# Altium PCB NGUON_A313.PcbDoc
Units mm, origin at the board's own origin, x right, y up, seen from the top; angles counter-clockwise.
Board outline 153 x 94 mm, 2 copper layers (Top Layer, Bottom Layer); 50 components, 28 nets, 281 pads, 12 vias.
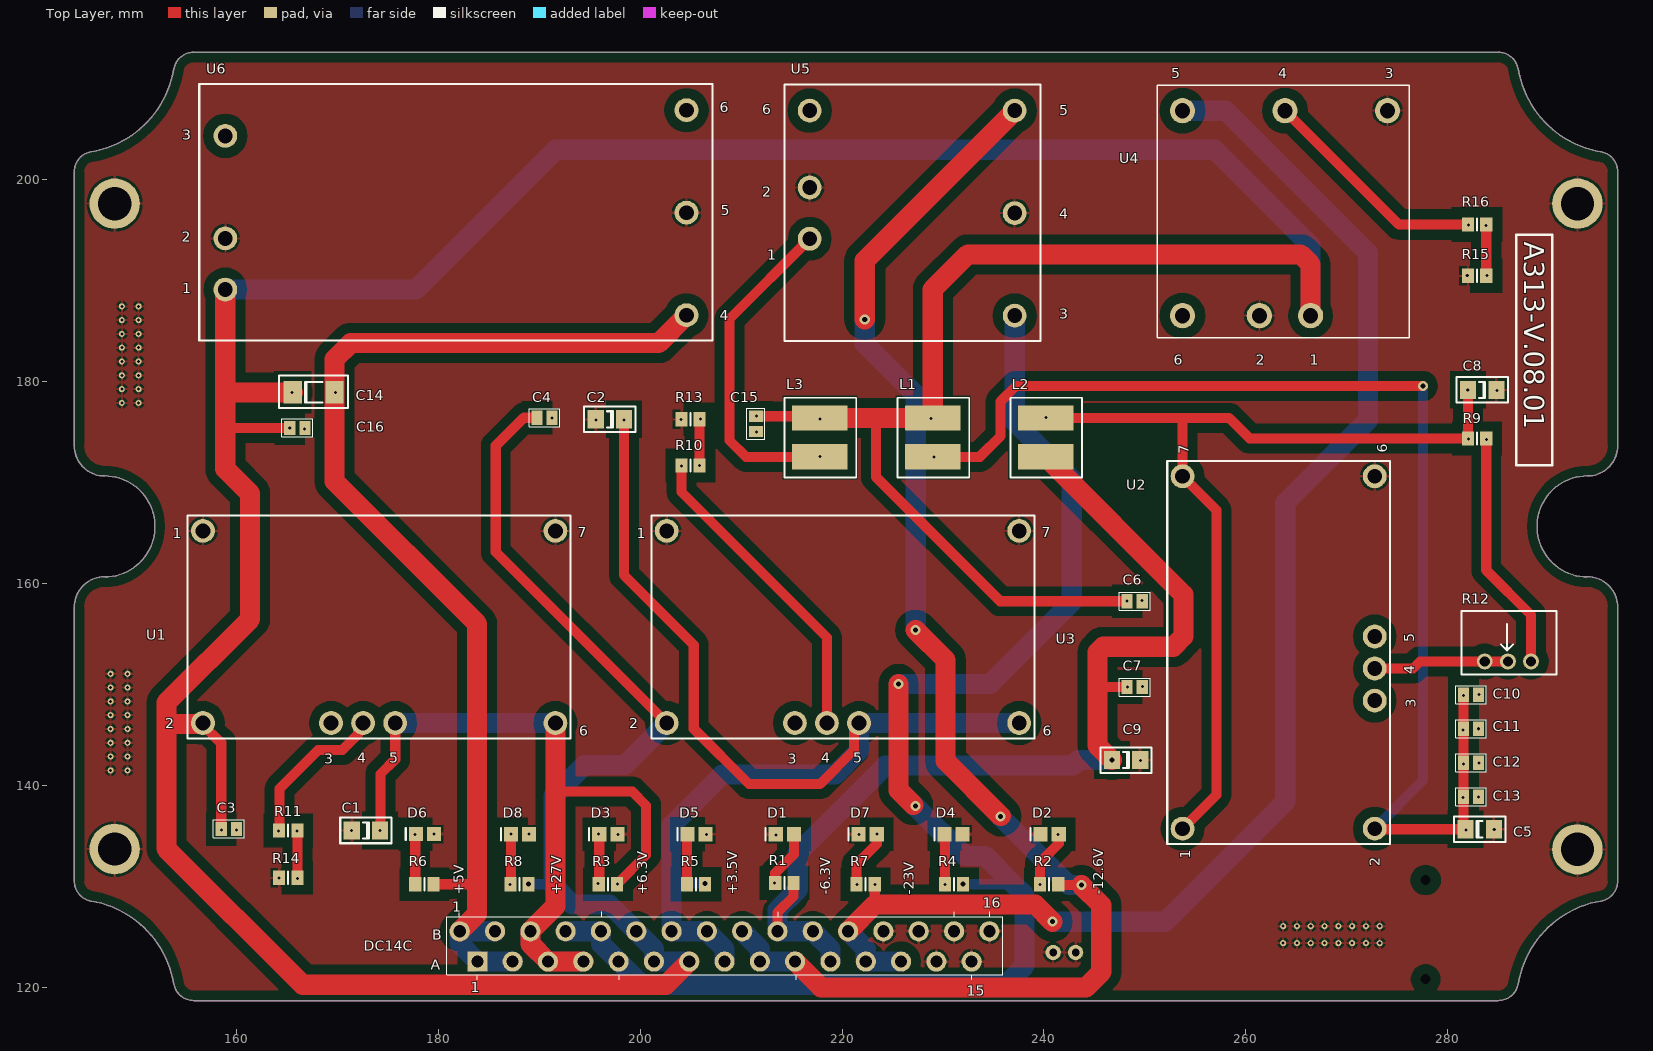
[diagram p0: Top Layer view]
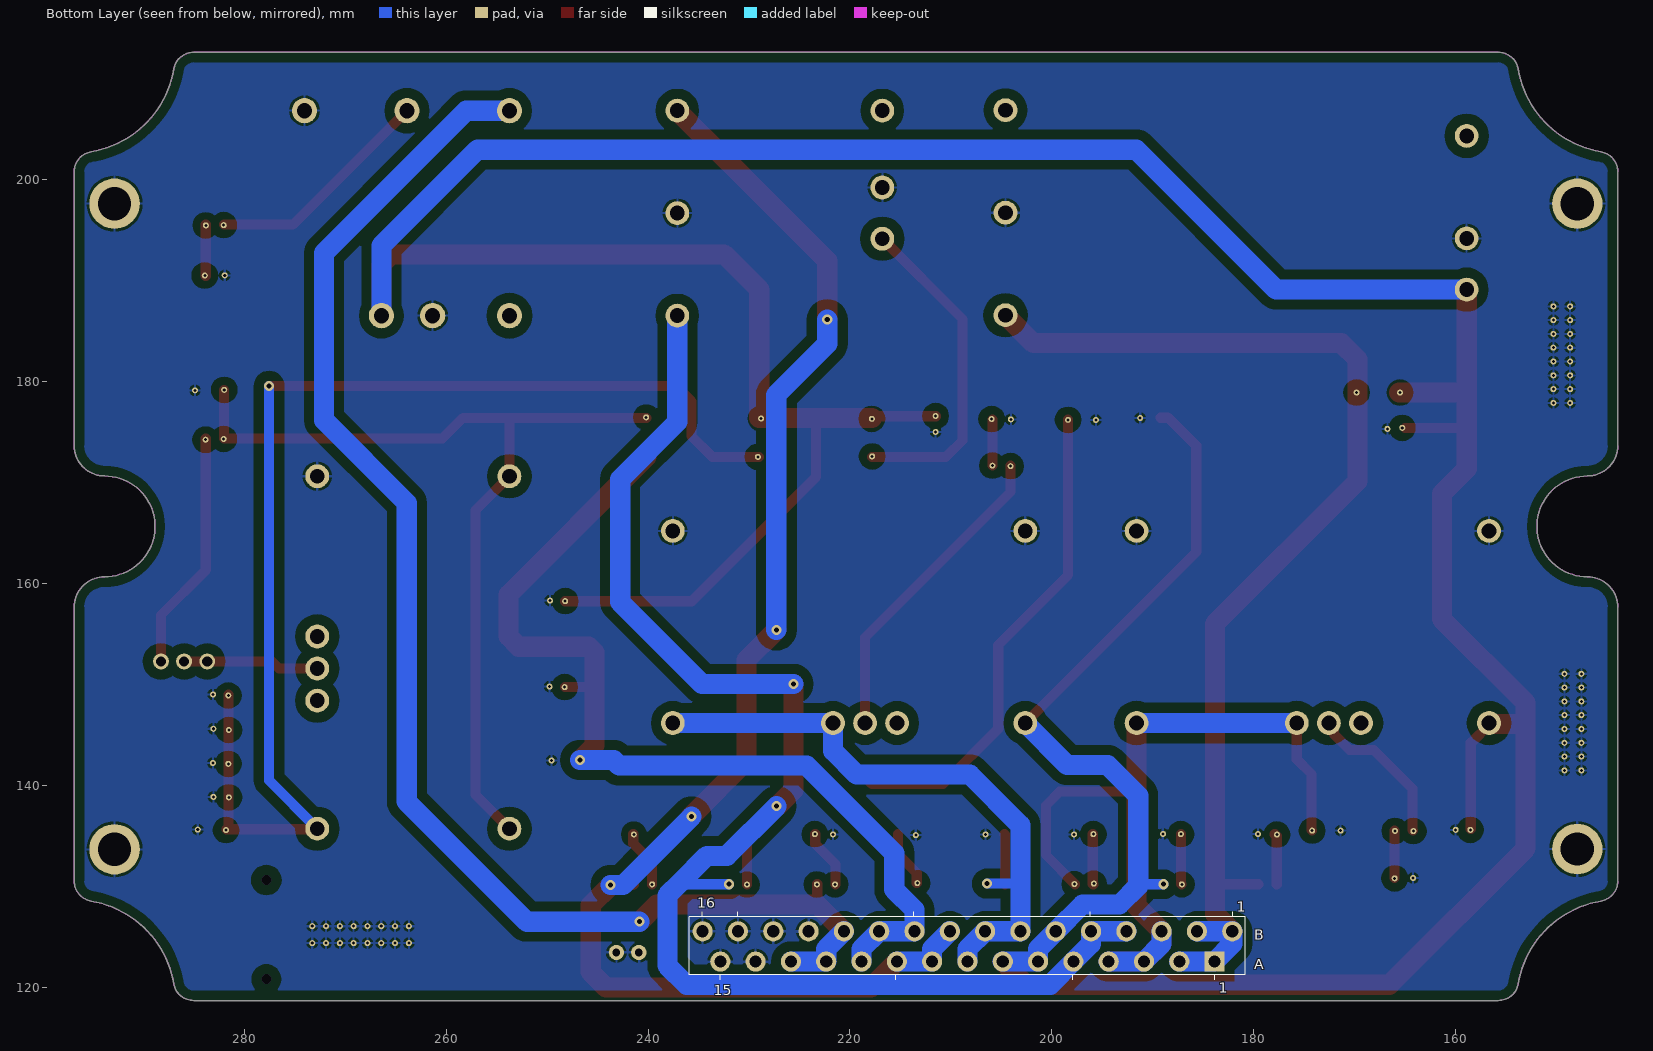
[diagram p1: Bottom Layer view, seen from below]

## Layer stack, top to bottom
Top Solder: solder mask 0.0102, Solder Resist, Dk 3.5
Top Layer: signal copper 0.0356
Dielectric 1: dielectric 0.32, FR-4, Dk 4.8
Bottom Layer: signal copper 0.0356
Bottom Solder: solder mask 0.0102, Solder Resist, Dk 3.5

## Board outline
145.557,128.518 cw(c145.891,130.49) 143.891,130.49 143.891,157.658 cw(c146.891,157.658) 146.891,160.658 ccw(c146.891,165.658) 146.891,170.658 cw(c146.891,173.658) 143.891,173.658 143.891,200.826 cw(c145.891,200.826) 145.557,202.798 ccw(c143.891,212.658) 153.751,210.992 cw(c155.723,210.658) 155.723,212.658 285.059,212.658 cw(c285.059,210.658) 287.031,210.992 ccw(c296.891,212.658) 295.224,202.798 cw(c294.891,200.826) 296.891,200.826 296.891,173.658 cw(c293.891,173.658) 293.891,170.658 ccw(c293.891,165.658) 293.891,160.658 cw(c293.891,157.658) 296.891,157.658 296.891,130.49 cw(c294.891,130.49) 295.224,128.518 ccw(c296.891,118.658) 287.031,120.325 cw(c285.059,120.658) 285.059,118.658 155.723,118.658 cw(c155.723,120.658) 153.751,120.325 ccw(c143.891,118.658)

## Design rules (kind name [scope] priority, off if disabled: settings)
Clearance [All] p1: gap=0.3 ignorepadtopadclearanceinfootprint=FALSE except(0.1: SMDPad-SMDPad; 1: Arc-Fill Arc-Poly Arc-Region Track-Fill Track-Poly Track-Region SMDPad-Fill SMDPad-Poly SMDPad-Region THPad-Fill THPad-Poly THPad-Region Via-Fill Via-Poly Via-Region Fill-Fill Fill-Poly Fill-Region Poly-Poly Poly-Region Region-Region)
HoleSize [All] p1: absolutevalues=TRUE maxlimit=4 minlimit=0.025 maxpercent=80.000 minpercent=20.000
MinimumSolderMaskSliver [All] p1: minsoldermaskwidth=0.05
PolygonConnect [All] p1: connectstyle=Relief reliefconductorwidth=0.254 reliefentries=4 polygonreliefangle="90 Angle" airgapwidth=0.254
RoutingVias [All] p1: holewidth=0.5 width=1 viastyle="Through Hole" minholewidth=0.5 minwidth=1 maxholewidth=0.5 maxwidth=1
SilkToSilkClearance [All] p1: silktosilkclearance=0.1
SilkToSolderMaskClearance [IsPad] p1: minsilkscreentomaskgap=0 clearancetoexposedcopper=TRUE
SolderMaskExpansion [All] p1: expansion=0.102
Width [All] p1: maxlimit=2 minlimit=1 preferedwidth=1
26 further rules are at their usual default settings.

## Components (designator, comment, footprint, x,y, rotation, side; value= is the part's Value field where it differs from the comment)
C1 "330U" 1206 172.797,135.52 r180 top
C2 "330U" 1206 196.977,176.274 r180 top
C3 "2.2U" C0805 159.208,135.672 r0 top
C4 "2.2U" C0805 190.5,176.426 r0 top
C5 "100u/50v" 1206 283.21,135.636 r0 top
C6 "1u/50v" C0805 249.01,158.242 r0 top
C7 "1u/50v" C0805 249.01,149.733 r0 top
C8 "100u/25v" 1206 283.458,179.197 r180 top
C9 "1000u/16v" 1206 248.158,142.494 r180 top
C10 "4.7u/50V" C0805 282.358,148.971 r0 top
C11 "4.7u/50V" C0805 282.358,145.599 r0 top
C12 "4.7u/50V" C0805 282.358,142.228 r0 top
C13 "4.7u/50V" C0805 282.358,138.856 r0 top
C14 "1000p/2KV" C1808 167.616,178.943 r0 top
C15 "4.7u" C0805 211.455,175.826 r270 top
C16 "4.7u" C0805 166,175.425 r0 top
D1 "LED3" CAPC2512L 214.33,135.141 r0 top
D2 "LED3" CAPC2512L 240.579,135.141 r0 top
D3 "LED3" CAPC2512L 196.831,135.141 r0 top
D4 "LED3" CAPC2512L 231.05,135.141 r0 top
D5 "LED3" CAPC2512L 205.581,135.141 r0 top
D6 "LED3" CAPC2512L 178.65,135.15 r0 top
D7 "LED3" CAPC2512L 222.54,135.141 r0 top
D8 "LED3" CAPC2512L 188.082,135.141 r0 top
DC14A "CON31" DC31C 199.587,130.629 r90 top
L1 "1-5uH" L_cuoncam 229.599,174.797 r0 top
L2 "1-5uH" L_cuoncam 240.792,174.797 r0 top
L3 "2.2uH" L_cuoncam 218.406,174.797 r0 top
R1 "Res3" 6-0805_N 214.28,130.315 r0 top value=680R
R2 "Res3" 6-0805_N 240.529,130.188 r0 top value=1.5K
R3 "Res3" 6-0805_N 196.781,130.188 r0 top value=680R
R4 "Res3" 6-0805_N 231.09,130.188 r0 top value=1.5K
R5 "Res3" 6-0805_N 205.531,130.188 r0 top value=330R
R6 "Res3" 6-0805_N 178.593,130.188 r0 top value=470R
R7 "Res3" 6-0805_N 222.34,130.188 r0 top value=3.3K
R8 "Res3" 6-0805_N 188.032,130.188 r0 top value=3.9K
R9 "4.18k" 6-0805_N 282.956,174.371 r0 top
R10 "62K" 6-0805_N 204.978,171.704 r0 top
R11 "1.6K" 6-0805_N 165.1,135.522 r0 top
R12 "POT" R_bientro 285.887,147.41 r270 top
R13 "100R" 6-0805_N 204.978,176.276 r0 top
R14 "10K" 6-0805_N 165.1,130.825 r0 top
R15 "47K" 6-0805_N 282.956,190.5 r180 top
R16 "910K" 6-0805_N 282.956,195.58 r0 top
U1 "PTN78020W" PTN78020W 173.863,154.051 r0 top
U2 "ptn78020a" PTN78020W 264.922,152.908 r90 top
U3 "PTN78020W" PTN78020W 219.837,154.051 r0 top
U4 "THN30-2415" THN30-2415 263.202,193.101 r0 top
U5 "thn30-2422" Thn30-2422-12V 226.314,195.373 r0 top
U6 "TEN40-2411N" TEN40 177.8,195.961 r0 top

## Footprints (in the part's own frame and the unit in brackets; to place one, negate y for a bottom-side part, rotate by r counter-clockwise, add the part's x,y. Pads: shape width x height; smd on the part's side, far side on the other; paste and mask are expansions set on the pad)
6-0805_N [mm] "Chip Resistor, Body 2.0x1.2mm, IPC Medium Density"
  rect 1.2x1.4 smd: 1(-0.9,0) 2(0.9,0)
  silkscreen extent 0,-0.6 0,0.6, body extent -1.07,-0.7 1.07,0.7, height 0.7
1206 [mm] "Chip Capacitor; Body 3.2 x 1.6 mm (LxW typ)"
  rect 1.6x1.8 smd: 1(-1.4,0) 2(1.4,0)
  silkscreen extent -2.54,-1.27 2.54,1.27
C0805 [mm] "Chip Capacitor, Body 2.0x1.3mm, IPC High Density"
  rect 1.1x1.4 smd: 1(-0.75,0) 2(0.75,0)
  silkscreen extent -1.52,-0.89 1.52,0.89, body extent -1.1,-0.72 1.1,0.72, height 1.4
C1808 [mm] "Chip Capacitor; Body 4.5 x 2.0 mm (LxW typ)"
  rect 1.8x2.25 smd: 1(-2.075,0) 2(2.075,0)
  silkscreen extent -3.43,-1.52 3.43,1.65
CAPC2512L [mm] "Chip Capacitor, Body 2.54x1.27mm, IPC High Density"
  rect 1.4x1.4 smd: 1(-0.9,0) 2(0.9,0)
  silkscreen extent -1.9,-0.6 -1.9,0.6, body extent -1.45,-0.82 1.45,0.82, height 1.3
DC31C [mm]
  rect 2x2 hole 1.2: 1(-8.104,15.737)
  round 2 hole 1.2: 2(-5.104,17.487) 3(-8.104,12.237) 4(-5.104,13.987) 5(-8.104,8.737) 6(-5.104,10.487) 7(-8.104,5.237) 8(-5.104,6.987) 9(-8.104,1.737) 10(-5.104,3.487) 11(-8.104,-1.763) 12(-5.104,-0.013) 13(-8.104,-5.263) 14(-5.104,-3.513) 15(-8.104,-8.763) 16(-5.104,-7.013) 17(-8.104,-12.263) 18(-5.104,-10.513) 19(-8.104,-15.763) 20(-5.104,-14.013) 21(-8.104,-19.263) 22(-5.104,-17.513) 23(-8.104,-22.763) 24(-5.104,-21.013) 25(-8.104,-26.263) 26(-5.104,-24.513) 27(-8.104,-29.763) 28(-5.104,-28.013) 29(-8.104,-33.263) 30(-5.104,-31.513) 31(-5.104,-35.013)
  silkscreen extent -9.91,-36.32 -3.18,18.79
L_cuoncam [mm]
  rect 5.5x2.5 smd: 1(-0.601,1.606) 2(-0.601,-2.244)
  silkscreen extent -4.1,-4.29 3,3.61, body extent -4.2,-4.39 3.1,3.71, height 3.81
PTN78020W [mil]
  round 93 / inner round 60 / far side round 93 hole 58: 1(-677.87,439.65) 2(-677.87,-310.35) 3(-177.87,-310.35) 4(-52.67,-310.35) 5(72.53,-310.35) 6(697.72,-310.35) 7(697.72,439.65)
  silkscreen extent -738,-370 757,499, body extent -698,-558 806,320, height 150
R_bientro [mil]
  round 62 / inner round 60 / far side round 62 hole 40: 1(-191.46,94.76) 2(-191.46,4.61) 3(-191.46,-85.55)
  silkscreen extent -388,-176 -140,194, body extent -392,-180 -136,198, height 150
TEN40 [mil]
  round 93 / inner round 60 / far side round 93 hole 58: 1(-745.67,-268.81) 2(-745.67,-68.81) 3(-745.67,331.19) 4(1054.33,-368.81) 5(1054.33,31.19) 6(1054.33,431.19)
  silkscreen extent -847,-467 1157,533
THN30-2415 [mm]
  round 2.5 / inner round 1.524 / far side round 2.5 hole 1.5: 1(3.244,-6.555) 2(-1.836,-6.555) 3(10.864,13.765) 4(0.704,13.765) 5(-9.456,13.765) 6(-9.456,-6.555)
  silkscreen extent -11.96,-8.74 13.05,16.27
Thn30-2422-12V [mil]
  round 93 / inner round 60 / far side round 93 hole 58: 1(-374.8,-47.24) 2(-374.8,152.76) 3(425.2,-347.24) 4(425.2,52.76) 5(425.2,452.76) 6(-374.8,452.76)
  silkscreen extent -473,-446 527,554, body extent -477,-450 531,558, height 150

## Part data
C1 C2 C5 C8 C9: library part CAPACITOR
C3 C4 C6 C7 C10 C11 C12 C13: library part "CAP NP"
C14 C15 C16: library part "CAPACITOR NON-POL"
D1 D2 D3 D4 D5 D6 D7 D8: "Typical BLUE SiC LED", DatasheetVersion=16-Apr-2002, LatestRevisionDate=17-Dec-2003, LatestRevisionNote="PCB Footprint replaced.", PackageReference=3.5X2.8X1.9, PackageVersion=16-Apr-2002, Published=8-Jun-2000, Publisher="Altium Limited"
L1 L2: library part INDUCTOR
L3: library part INDUCTOR_Dup1
R1 R2 R3 R4 R5 R6 R7 R8: "Resistor", LatestRevisionDate=29-May-2009, LatestRevisionNote="IPC-7351 Footprint Added.", PackageDescription="Chip Resistor", PackageReference=J1-0603, Published=8-Jun-2000, Publisher="Altium Limited"
R9 R10 R11 R13 R14 R15 R16: library part RESISTOR
R12: library part POT_Dup1
U1 U3: library part ptn78020w_8
U2: library part PTN78020A_0
U4: library part thn30-2415_1
U6: library part thn30-2422_0

## Free pads (board coordinates)
  round 0.6 hole 0.3: 1(147.5,141.475) 1(147.5,142.843) 1(147.5,144.211) 1(147.5,145.579) 1(147.5,146.946) 1(147.5,148.314) 1(147.5,149.682) 1(147.5,151.05) 1(148.6,177.9) 1(148.6,179.268) 1(148.6,180.636) 1(148.6,182.004) 1(148.6,183.371) 1(148.6,184.739) 1(148.6,186.107) 1(148.6,187.475) 1(149.175,141.475) 1(149.175,142.843) 1(149.175,144.211) 1(149.175,145.579) 1(149.175,146.946) 1(149.175,148.314) 1(149.175,149.682) 1(149.175,151.05) 1(150.275,177.9) 1(150.275,179.268) 1(150.275,180.636) 1(150.275,182.004) 1(150.275,183.371) 1(150.275,184.739) 1(150.275,186.107) 1(150.275,187.475) 1(263.725,124.349) 1(263.725,126.024) 1(265.093,126.024) 1(265.093,124.349) 1(266.461,126.024) 1(266.461,124.349) 1(267.829,126.024) 1(267.829,124.349) 1(269.196,126.024) 1(269.196,124.349) 1(270.564,126.024) 1(270.564,124.349) 1(271.932,126.024) 1(271.932,124.349) 1(273.3,126.024) 1(273.3,124.349) 5(158.5,135.575) 5(159.95,135.575) 5(164.15,135.45) 5(164.175,130.8) 5(165.25,175.425) 5(165.475,178.925) 5(165.975,135.475) 5(166,130.775) 5(166.725,175.325) 5(169.775,178.925) 5(171.35,135.5) 5(174.175,135.5) 5(177.675,135.1) 5(179.55,135.15) 5(187.1,130.175) 5(187.2,135.15) 5(188.95,135.175) 5(191.225,176.4) 5(195.625,176.2) 5(195.825,130.25) 5(195.875,135.15) 5(197.75,130.2) 5(197.775,135.125) 5(198.375,176.225) 5(204.05,176.275) 5(204.075,171.625) 5(205.875,171.675) 5(205.95,176.3) 5(206.55,135.125) 5(211.5,175.025) 5(211.5,176.6) 5(213.325,130.3) 5(213.475,135.05) 5(217.8,172.6) 5(217.825,176.325) 5(221.475,130.175) 5(221.675,135.125) 5(223.275,130.175) 5(223.475,135.15) 5(228.8,176.35) 5(229.125,172.55) 5(230.2,130.15) 5(239.6,130.175) 5(240.2,176.475) 5(241.425,135.125) 5(248.225,158.25) 5(248.275,149.725) 5(249.575,142.45) 5(249.725,158.3) 5(249.775,149.775) 5(281.575,138.8) 5(281.575,145.475) 5(281.625,142.125) 5(281.625,148.9) 5(281.85,135.55) 5(281.975,190.55) 5(282.025,179.2) 5(282.075,174.325) 5(282.075,195.525) 5(283.1,138.85) 5(283.1,145.6) 5(283.125,149) 5(283.15,142.2) 5(283.85,195.5) 5(283.875,174.25) 5(283.956,190.525) 5(284.65,135.6) 5(284.925,179.15)
  round 1.524 hole 0.762: 1(240.925,123.425) 1(243.15,123.425)
  round 0 hole 1: 6(277.85,130.6) 7(277.85,120.775)
  round 5 hole 3.3: CK(147.9,133.675) CK(147.9,197.65) CK(292.9,133.65) CK(292.9,197.65)

## Via types
v1: diameter 1, hole 0.5, Top Layer to Bottom Layer, 12 vias

## Nets (pads, with @x,y where several pads share a name; then routed paths per layer and width w, separated by ;. In a path a pad name is that pad's centre, name@x,y a point inside that pad or via, vN(x,y) a via of type N, cw(c..) or ccw(c..) an arc to the next point about the centre after c; other vN are vias at no path point)
27V: C3.1 C4.1 C6.1 C14.1 C15.1 C16.1 DC14A.11 DC14A.12 DC14A.13 L1.1 L3.1 pad.5@158.5,135.575 pad.5@165.25,175.425 pad.5@165.475,178.925 pad.5@211.5,176.6 pad.5@217.825,176.325 pad.5@228.8,176.35 pad.5@248.225,158.25 R8.2 U1.2 U3.2 U4.1 U6.1 | length 462.8
  Top Layer w1: U1.2@156.552,146.075 158.458,144.169 ; C3.1 158.458,144.169 ; 158.458,144.255 158.458,144.169 ; 158.86,175.4 158.885,175.425 C16.1@164.975,175.425 ; C4.1@189.2,176.426 188.451,176.426 185.675,173.65 185.675,163.112 U3.2 ; C15.1 217.632,176.576 L3.1 ; 223.35,176.403 223.35,170.575 235.683,158.242 C6.1
  Top Layer w2: U1.2@156.552,146.075 153.025,146.075 ; U6.1 158.86,178.85 ; C14.1 158.953,178.943 158.86,178.85 ; DC14A.13 202.55,120.225 166.525,120.225 153.025,133.725 153.025,146.075 ; L3.1 223.35,176.403 L1.1 228.998,189.148 232.475,192.625 265.45,192.625 266.446,191.629 U4.1 ; 153.025,146.075 153.025,148.175 161.325,156.475 161.325,168.9 158.86,171.365 158.86,175.4 158.86,178.85
  Bottom Layer w1: v1(188.932,130.188) 191.262,130.188 191.425,130.025
  Bottom Layer w2: U6.1 177.733,189.133 191.6,203 256.925,203 266.446,193.479 U4.1 ; U3.2 198.451,142 194.45,142 191.425,138.975 191.425,130.025 193.275,128.175 196.95,128.175 DC14A.12 201.35,123.775 DC14A.11 DC14A.13
+3.5V: C2.1 DC14A.14 DC14A.15 DC14A.16 pad.5@198.375,176.225 R5.2 U3.5 U3.6 | length 117.4
  Top Layer w1: C2.1 198.377,160.826 205.3,153.903 205.3,145.6 210.768,140.132 217.825,140.132 221.18,143.487 221.18,145.669 U3.5
  Bottom Layer w1: 203.1,130.125 203.219,130.244 v1(206.431,130.244)
  Bottom Layer w2: DC14A.15 208.35,123.775 DC14A.16 DC14A.14 203.1,130.125 203.1,136.05 208.1,141.05 219.325,141.05 221.679,143.404 U3.5 U3.6
+5V: C14.2 DC14A.1 DC14A.2 DC14A.3 DC14A.4 pad.5@169.775,178.925 R6.2 U6.4 | length 115
  Top Layer w1: R6.2 183.812,130.188 183.825,130.175
  Top Layer w2: DC14A.2 183.825,127.25 183.825,130.175 183.825,156 169.691,170.134 C14.2 169.691,182.227 171.289,183.825 201.812,183.825 U6.4
  Bottom Layer w2: DC14A.4 DC14A.2 182.1,124.275 DC14A.1 DC14A.3
+6.3V: C1.1 DC14A.5 DC14A.6 DC14A.7 pad.5@174.175,135.5 pad.5@197.75,130.2 R3.2 U1.5 U1.6 | length 81.8
  Top Layer w1: C1.1 174.247,135.57 174.247,141.122 175.705,142.58 U1.5 ; 191.585,139.375 199.2,139.375 200.575,138 200.575,133.082 R3.2
  Top Layer w2: U1.6 191.585,139.375 191.585,128.01 DC14A.6 189.1,124.275 DC14A.5 DC14A.7
  Bottom Layer w2: U1.5@175.706,146.168 U1.6 ; DC14A.6 189.1,124.275 DC14A.5 DC14A.7
+12.6V: DC14A.8 DC14A.9 DC14A.10 R4.2 U5.3 | length 139.4
  Top Layer w2: v1(225.6,150.05) 225.6,139.5 v1@227.05,138.05
  Bottom Layer w1: v1(231.99,130.19) 236.615,130.19 236.8,130.375
  Bottom Layer w2: DC14A.8 DC14A.10 196.1,124.275 DC14A.9 200.15,120.225 205.803,120.225 207.397,120.225 209.303,120.225 210.897,120.225 216.303,120.225 217.897,120.225 219.803,120.225 221.397,120.225 226.803,120.225 228.397,120.225 230.303,120.225 231.897,120.225 236.2,120.225 238.1,122.125 238.1,129.075 236.8,130.375 234.175,133 232.2,133 v1(227.275,137.925) ; v1(225.6,150.05) 234.675,150.05 242.775,158.15 242.775,170.35 237.114,176.011 U5.3
-6.3V: C7.1 C9.2 DC14A.20 DC14A.21 DC14A.22 L2.2 pad.5@248.275,149.725 R1.2 | length 103.2
  Top Layer w1: DC14A.20 213.6,127.4 215.18,128.98 R1.2 ; 245.325,149.475 245.583,149.733 C7.1
  Top Layer w2: L2.2 253.85,158.894 253.85,154.75 252.825,153.725 245.875,153.725 245.325,153.175 245.325,149.475 245.325,143.927 v1(246.758,142.494)
  Bottom Layer w2: DC14A.21 218.85,123.775 DC14A.22 DC14A.20 213.6,127.65 215.6,129.65 215.6,133.275 224.275,141.95 242.875,141.95 243.419,142.494 v1(246.758,142.494)
-12.6V: DC14A.17 DC14A.18 DC14A.19 R2.2 U5.5 | length 143.6
  Top Layer w1: R2.2 241.517,130.1 v1(243.725,130.1)
  Top Layer w2: DC14A.19 217.909,119.966 244.191,119.966 245.7,121.475 245.7,128.125 v1(243.725,130.1) ; v1(222.25,186.175) 222.25,192.009 U5.5 ; v1(227.3,155.375) 230.25,152.425 230.25,142.425 v1@235.737,136.938
  Bottom Layer w2: DC14A.18 211.85,123.775 DC14A.17 DC14A.19 ; v1(222.25,186.175) 222.25,183.75 227.3,178.7 v1(227.3,155.375) ; v1(235.7,136.9) 242.5,130.1 v1(243.725,130.1)
-23V: DC14A.23 DC14A.24 DC14A.25 pad.5@223.275,130.175 R7.2 U4.5 | length 141.3
  Top Layer w1: R7.2 223.24,128.185 223.25,128.175
  Top Layer w2: DC14A.24 223.25,128.175 239.15,128.175 v1(240.85,126.475)
  Bottom Layer w2: DC14A.24 222.35,123.775 DC14A.23 DC14A.25 ; v1(240.85,126.475) 252.025,126.475 263.925,138.375 263.925,167.975 272.125,176.175 272.125,192.775 258.034,206.866 U4.5
GND: C1.2 C2.2 C3.2 C4.2 C5.2 C6.2 C7.2 C8.1 C9.1 C10.2 C11.2 C12.2 C13.2 C15.2 C16.2 D1.1 D2.1 D3.2 D4.2 D5.2 D6.2 D7.1 D8.2 DC14A.26 DC14A.27 DC14A.28 DC14A.29 DC14A.30 DC14A.31 pad.1 pad.5@159.95,135.575 pad.5@164.175,130.8 pad.5@166.725,175.325 pad.5@171.35,135.5 pad.5@179.55,135.15 pad.5@188.95,135.175 pad.5@191.225,176.4 pad.5@195.625,176.2 pad.5@197.775,135.125 pad.5@204.05,176.275 pad.5@206.55,135.125 pad.5@211.5,175.025 pad.5@213.475,135.05 pad.5@221.675,135.125 pad.5@249.575,142.45 pad.5@249.725,158.3 pad.5@249.775,149.775 pad.5@281.975,190.55 pad.5@283.1,138.85 pad.5@283.1,145.6 pad.5@283.15,142.2 pad.5@283.125,149 pad.5@284.65,135.6 pad.5@284.925,179.15 pad.CK R13.1 R14.1 R15.2 U1.1 U1.7 U2.6 U3.1 U3.7 U4.2 U4.3 U5.2 U5.4 U6.2 U6.5
NetC5_1: C5.1 C10.1 C11.1 C12.1 C13.1 L1.2 pad.5@229.125,172.55 pad.5@281.85,135.55 pad.5@281.575,138.8 pad.5@281.575,145.475 pad.5@281.625,142.125 pad.5@281.625,148.9 U2.2 | length 121.8
  Top Layer w1: L1.2 233.653,172.553 235.725,174.625 235.725,178.058 237.242,179.575 v1(277.575,179.575) ; U2.2 272.859,135.636 C5.1 281.608,135.838 C10.1
  Bottom Layer w1: U2.2 277.575,140.46 v1(277.575,179.575)
NetC8_2: C8.2 L2.1 pad.5@240.2,176.475 pad.5@282.025,179.2 pad.5@282.075,174.325 R9.1 U2.1 U2.7 | length 91.1
  Top Layer w1: L2.1 253.65,176.403 ; U2.1 257.1,139.035 257.1,167.285 U2.7 253.755,176.298 253.65,176.403 ; C8.2 282.056,179.195 R9.1 260.404,174.371 258.372,176.403 253.65,176.403
NetD1_2: D1.2 pad.5@213.325,130.3 R1.1 | length 5.6
  Top Layer w1: R1.1 213.38,131.305 215.23,133.155 D1.2
NetD2_2: D2.2 pad.5@239.6,130.175 pad.5@241.425,135.125 R2.1 | length 5.7
  Top Layer w1: R2.1 239.629,132.379 241.479,134.229 D2.2
NetD3_1: D3.1 pad.5@195.825,130.25 pad.5@195.875,135.15 R3.1 | length 5
  Top Layer w1: R3.1 195.931,130.238 D3.1
NetD4_1: D4.1 pad.5@230.2,130.15 R4.1 | length 4.8
  Top Layer w1: R4.1 D4.1@230.19,134.941
NetD5_1: D5.1 R5.1 | length 5
  Top Layer w1: R5.1 204.631,135.091 D5.1
NetD6_1: D6.1 pad.5@177.675,135.1 R6.1 | length 5
  Top Layer w1: R6.1 177.693,134.941 D6.1@177.893,135.141
NetD7_2: D7.2 pad.5@221.475,130.175 pad.5@223.475,135.15 R7.1 | length 5.8
  Top Layer w1: R7.1 221.44,132.165 223.44,134.165 D7.2
NetD8_1: D8.1 pad.5@187.1,130.175 pad.5@187.2,135.15 R8.1 | length 5
  Top Layer w1: R8.1 187.182,130.238 D8.1
NetL3_2: L3.2 pad.5@217.8,172.6 U5.1 | length 32.9
  Top Layer w1: U5.1 208.85,186.229 208.85,174.178 210.475,172.553 L3.2
NetR9_2: pad.5@283.875,174.25 R9.2 R12.1 | length 23.9
  Top Layer w1: R9.2 283.856,161.319 288.294,156.881 R12.1
NetR10_1: pad.5@204.075,171.625 R10.1 U3.4 | length 31.5
  Top Layer w1: R10.1 204.078,169.072 218.499,154.651 U3.4
NetR10_2: pad.5@205.95,176.3 pad.5@205.875,171.675 R10.2 R13.2 | length 4.6
  Top Layer w1: R10.2 R13.2
NetR11_1: pad.5@164.15,135.45 R11.1 U1.4 | length 15.5
  Top Layer w1: R11.1 164.25,135.572 164.25,139.675 168.062,143.487 170.456,143.487 172.026,145.057 172.026,145.669 U1.4
NetR11_2: pad.5@165.975,135.475 pad.5@166,130.775 R11.2 R14.2 | length 4.7
  Top Layer w1: R14.2 R11.2
NetR12_2: R12.2 R12.3 U2.4 | length 13.5
  Top Layer w1: U2.4 276.595,151.57 277.298,152.273 R12.3 R12.2
NetR15_1: pad.5@283.85,195.5 pad.5@283.956,190.525 R15.1 R16.2 | length 5.1
  Top Layer w1: R15.1 R16.2
NetR16_1: pad.5@282.075,195.525 R16.1 U4.4 | length 22.8
  Top Layer w1: U4.4 275.192,195.58 R16.1
pads on no net: U1.3 U2.3 U2.5 U3.3 U4.6 U5.6 U6.3 U6.6

## Polygon pours and split planes (outlines as drawn)
GND on Top Layer "Top Layer-No Net" (solid, remove dead copper, pour order 0): 145.557,128.518 cw(c145.891,130.49) 143.891,130.49 143.891,157.658 cw(c146.891,157.658) 146.891,160.658 ccw(c146.891,165.658) 146.891,170.658 cw(c146.891,173.658) 143.891,173.658 143.891,200.826 cw(c145.891,200.826) 145.557,202.798 ccw(c143.891,212.658) 153.751,210.992 cw(c155.723,210.658) 155.723,212.658 285.059,212.658 cw(c285.059,210.658) 287.031,210.992 ccw(c296.891,212.658) 295.224,202.798 cw(c294.891,200.826) 296.891,200.826 296.891,173.658 cw(c293.891,173.658) 293.891,170.658 ccw(c293.891,165.658) 293.891,160.658 cw(c293.891,157.658) 296.891,157.658 296.891,130.49 cw(c294.891,130.49) 295.224,128.518 ccw(c296.891,118.658) 287.031,120.325 cw(c285.059,120.658) 285.059,118.658 155.723,118.658 cw(c155.723,120.658) 153.751,120.325 ccw(c143.891,118.658)
GND on Bottom Layer "Top Layer-No Net1" (solid, remove dead copper, pour order 1): 145.557,128.518 cw(c145.891,130.49) 143.891,130.49 143.891,157.658 cw(c146.891,157.658) 146.891,160.658 ccw(c146.891,165.658) 146.891,170.658 cw(c146.891,173.658) 143.891,173.658 143.891,200.826 cw(c145.891,200.826) 145.557,202.798 ccw(c143.891,212.658) 153.751,210.992 cw(c155.723,210.658) 155.723,212.658 285.059,212.658 cw(c285.059,210.658) 287.031,210.992 ccw(c296.891,212.658) 295.224,202.798 cw(c294.891,200.826) 296.891,200.826 296.891,173.658 cw(c293.891,173.658) 293.891,170.658 ccw(c293.891,165.658) 293.891,160.658 cw(c293.891,157.658) 296.891,157.658 296.891,130.49 cw(c294.891,130.49) 295.224,128.518 ccw(c296.891,118.658) 287.031,120.325 cw(c285.059,120.658) 285.059,118.658 155.723,118.658 cw(c155.723,120.658) 153.751,120.325 ccw(c143.891,118.658)

## Keep-outs
Keep-Out Layer:
  the board outline again, w0.013

## Silkscreen, mask and mechanical layers (free items; w line width, h text height)
Top Overlay:
  lines w0.254: 286.85,171.7 290.4,171.7 290.4,194.55 286.85,194.55 286.85,171.7
  text "A313-V.08.01" at 287.6,193.9 h2 r270
  text "+5V" at 182.475,129.125 h1 r90
  text "+27V" at 192.15,129.125 h1 r90
  text "+6.3V" at 200.7,129.125 h1 r90
  text "+3.5V" at 209.625,129.125 h1 r90
  text "-6.3V" at 218.825,129.125 h1 r90
  text "-23V" at 227.1,129.125 h1 r90
  text "-12.6V" at 245.875,129.125 h1 r90
  text "DC14C" at 172.6,123.575 h1
Mechanical 1:
  circle w0.013: c292.891,133.658 r1.25
  circle w0.013: c147.891,133.658 r1.25
  circle w0.013: c147.891,197.658 r1.25
  circle w0.013: c292.891,197.658 r1.25

## Text inside footprints (layer, text, board x,y; h text height)
DC14A: Top Overlay "B" at 179.356,124.671 h1; Top Overlay "A" at 179.229,121.715 h1; Top Overlay "1" at 181.374,127.467 h1; Top Overlay "1" at 183.18,119.483 h1; Top Overlay "15" at 232.336,119.154 h1; Top Overlay "16" at 233.961,127.848 h1; Bottom Overlay "A" at 179.902,121.739 h1; Bottom Overlay "B" at 179.902,124.66 h1; Bottom Overlay "1" at 183.458,119.453 h1; Bottom Overlay "1" at 181.68,127.454 h1; Bottom Overlay "15" at 233.496,119.199 h1; Bottom Overlay "16" at 235.147,127.835 h1
L1: Mechanical 7 "2" at 228.023,173.823 h1 r270; Mechanical 7 "1" at 228.023,177.673 h1 r270
L2: Mechanical 7 "2" at 239.216,173.823 h1 r270; Mechanical 7 "1" at 239.216,177.673 h1 r270
L3: Mechanical 7 "2" at 216.83,173.823 h1 r270; Mechanical 7 "1" at 216.83,177.673 h1 r270
R12: Mechanical 7 "1" at 287.024,153.248 h1; Mechanical 7 "3" at 282.444,153.248 h1; Mechanical 7 "2" at 284.734,153.248 h1
U1: Top Overlay "5" at 175.133,142.24 h1; Top Overlay "4" at 171.958,142.24 h1; Top Overlay "7" at 193.802,164.592 h1; Top Overlay "6" at 193.929,144.907 h1; Top Overlay "3" at 168.656,142.113 h1; Top Overlay "2" at 152.908,145.669 h1; Top Overlay "1" at 153.67,164.465 h1
U2: Top Overlay "5" at 276.733,154.178 h1 r90; Top Overlay "4" at 276.733,151.003 h1 r90; Top Overlay "7" at 254.381,172.847 h1 r90; Top Overlay "6" at 274.066,172.974 h1 r90; Top Overlay "3" at 276.86,147.701 h1 r90; Top Overlay "2" at 273.304,131.953 h1 r90; Top Overlay "1" at 254.508,132.715 h1 r90
U3: Top Overlay "5" at 221.107,142.24 h1; Top Overlay "4" at 217.932,142.24 h1; Top Overlay "7" at 239.776,164.592 h1; Top Overlay "6" at 239.903,144.907 h1; Top Overlay "3" at 214.63,142.113 h1; Top Overlay "2" at 198.882,145.669 h1; Top Overlay "1" at 199.644,164.465 h1
U4: Top Overlay "5" at 252.65,210.1 h1; Top Overlay "4" at 263.225,210.1 h1; Top Overlay "3" at 273.775,210.1 h1; Top Overlay "6" at 252.9,181.675 h1; Top Overlay "2" at 261,181.675 h1; Top Overlay "1" at 266.375,181.675 h1; Mechanical 6 "4" at 262.572,206.866 h1; Mechanical 6 "5" at 252.412,206.866 h1; Mechanical 6 "1" at 265.112,186.546 h1; Mechanical 6 "2" at 260.032,186.546 h1; Mechanical 6 "3" at 272.732,206.866 h1
U5: Top Overlay "1" at 212.608,192.075 h1; Top Overlay "2" at 212.1,198.325 h1; Top Overlay "6" at 212.1,206.5 h1; Top Overlay "3" at 241.55,186.25 h1; Top Overlay "4" at 241.55,196.175 h1; Top Overlay "5" at 241.55,206.425 h1
U6: Top Overlay "1" at 154.6,188.775 h1; Top Overlay "2" at 154.55,193.9 h1; Top Overlay "3" at 154.6,203.975 h1; Top Overlay "4" at 207.875,186.075 h1; Top Overlay "5" at 207.975,196.525 h1; Top Overlay "6" at 207.875,206.7 h1; Mechanical 7 "3" at 159.155,204.373 h1 r180; Mechanical 7 "6" at 204.875,206.913 h1 r180; Mechanical 7 "5" at 204.875,196.753 h1 r180; Mechanical 7 "2" at 159.155,194.213 h1 r180; Mechanical 7 "1" at 159.155,189.133 h1 r180; Mechanical 7 "4" at 204.875,186.593 h1 r180